# Altium PCB Servo CB Upgrade.PcbDoc
Units mm, origin at the board's own origin, x right, y up, seen from the top; angles counter-clockwise.
Board outline 98.43 x 42.16 mm, 2 copper layers (Top Layer, Bottom Layer); 27 components, 20 nets, 144 pads, 29 vias.
Unrouted connection lines stored in the file: 5.
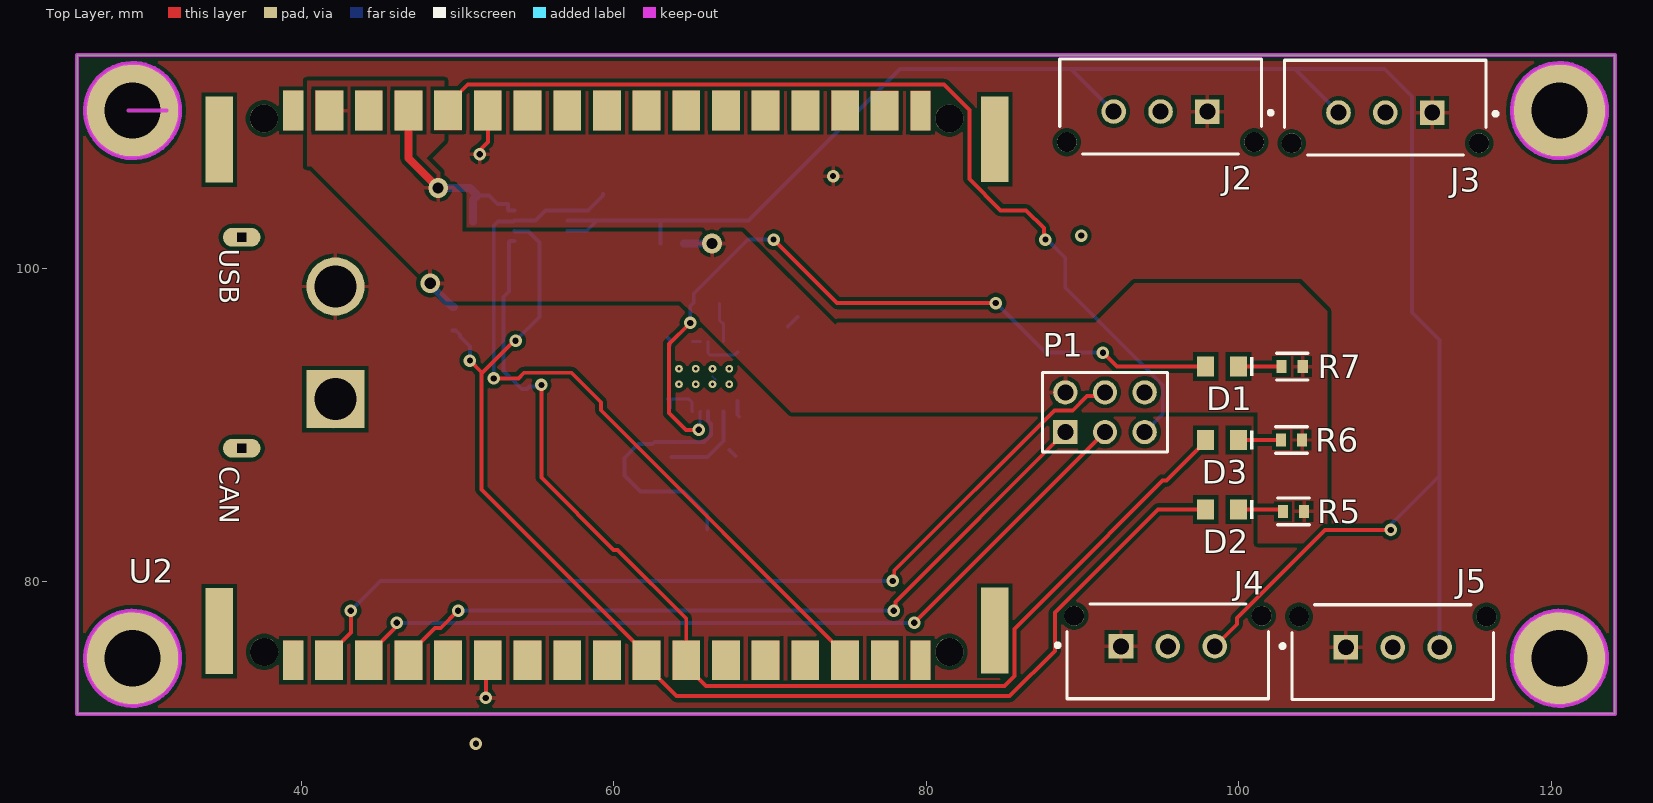
[diagram p0: Top Layer view]
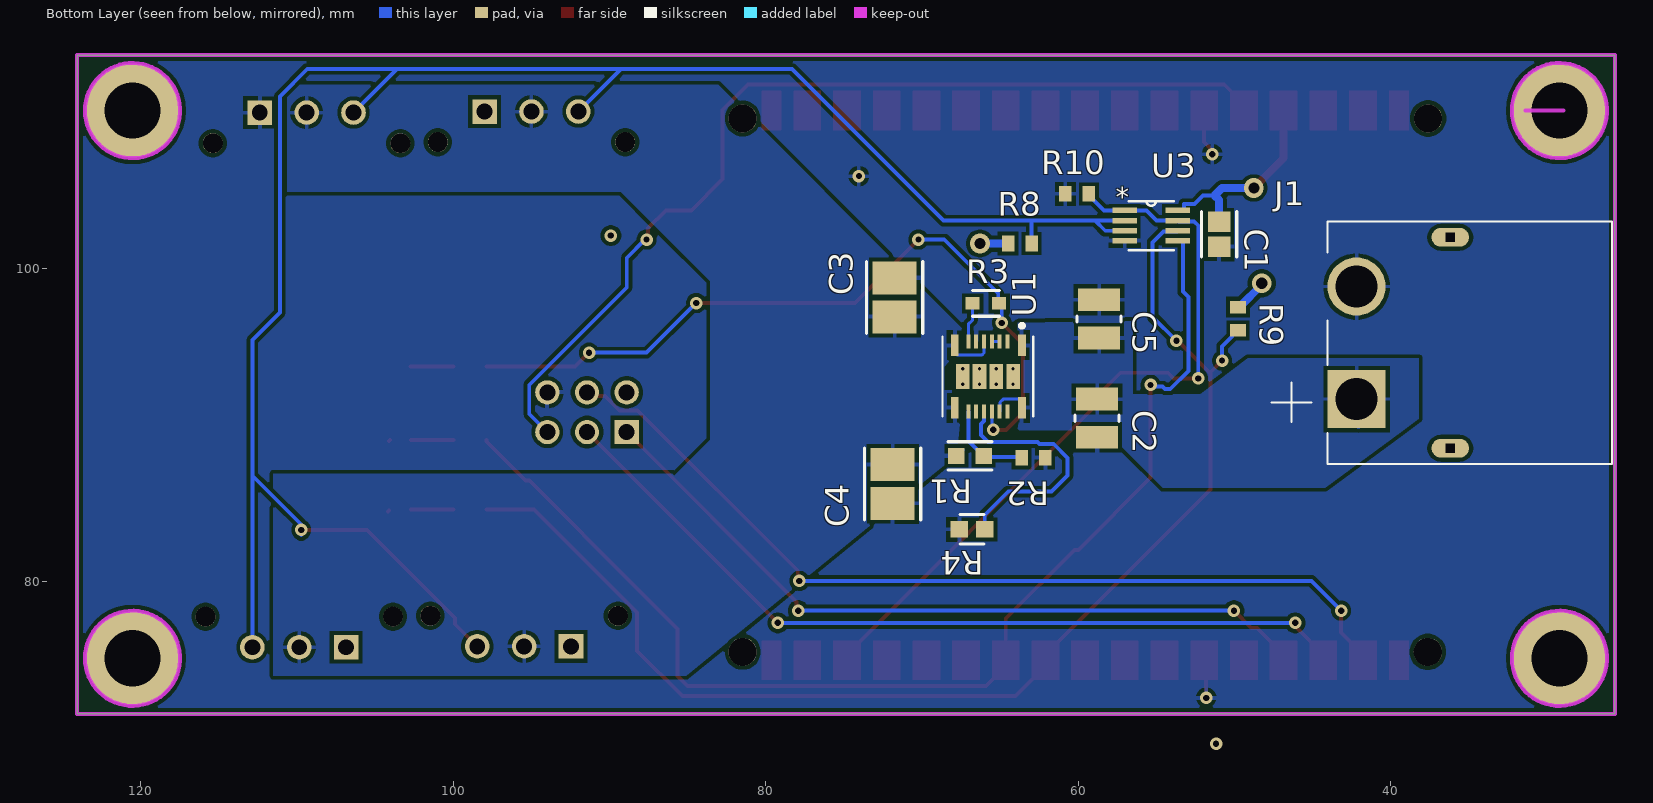
[diagram p1: Bottom Layer view, seen from below]
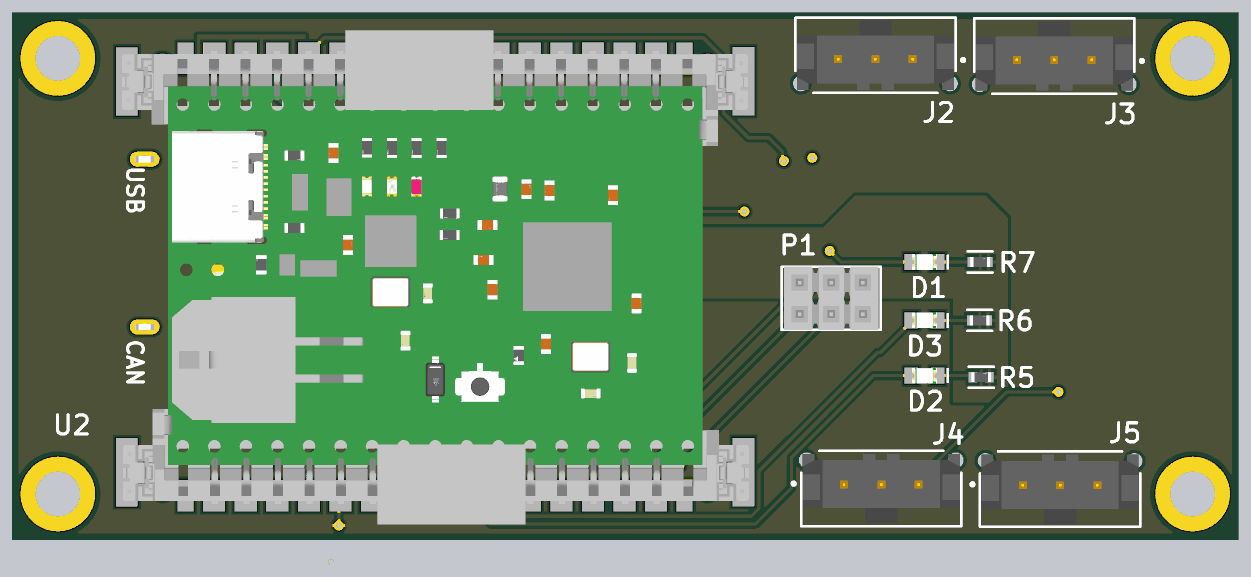
[diagram p2: 3D render of the assembled board from above, using the file's embedded part models]
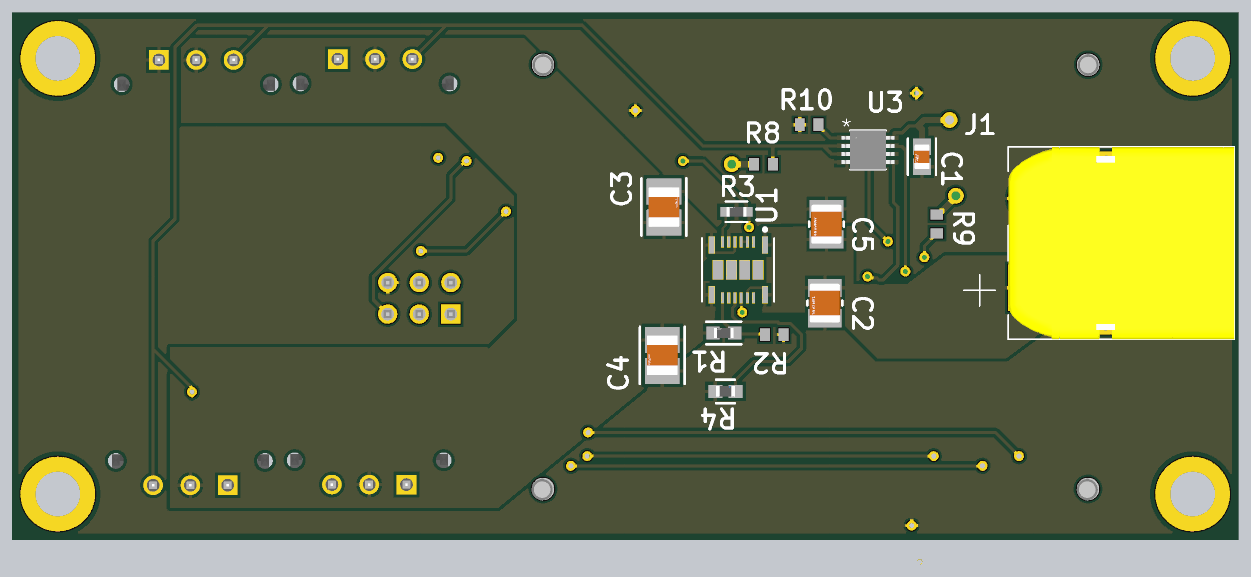
[diagram p3: 3D render of the assembled board from below, using the file's embedded part models]

## Layer stack, top to bottom
Top Solder: solder mask 0.0102, Solder Resist, Dk 3.5
Top Layer: signal copper 0.0356
Dielectric 1: dielectric 0.32, FR-4, Dk 4.8
Bottom Layer: signal copper 0.0356
Bottom Solder: solder mask 0.0102, Solder Resist, Dk 3.5

## Board outline
25.654,71.501 25.654,113.665 124.079,113.665 124.079,71.501

## Design rules (kind name [scope] priority, off if disabled: settings)
Clearance Clearance_1 [OnMid vs OnMid] p1: gap=0.254 ignorepadtopadclearanceinfootprint=FALSE sourcerule=36 cellrowname=All cellrowtype=0 cellcolname=All cellcoltype=0 innerlayers=TRUE
Clearance Clearance_2 [(ExistsOnLayer('Top Layer') Or ExistsOnLayer('Bottom Layer')) vs (ExistsOnLayer('Top Layer') Or ExistsOnLayer('Bottom Layer'))] p2: gap=0.254 ignorepadtopadclearanceinfootprint=FALSE sourcerule=36 cellrowname=All cellrowtype=0 cellcolname=All cellcoltype=0 outerlayers=TRUE
Clearance [All] p3: gap=0.254 ignorepadtopadclearanceinfootprint=FALSE ismatrix=TRUE
PolygonConnect [All] p1: connectstyle=Relief reliefconductorwidth=0.254 reliefentries=4 polygonreliefangle="90 Angle" airgapwidth=0.254
RoutingVias [All] p1: holewidth=0.711 width=1.27 viastyle="Through Hole" minholewidth=0.711 minwidth=1.27 maxholewidth=0.711 maxwidth=1.27
SolderMaskExpansion [All] p1: expansion=0.102 istentingtop=FALSE
Width [All] p1: maxlimit=0.5 minlimit=0.1 preferedwidth=0.25 minimp=50.000000 maximp=50.000000 favimp=50.000000
30 further rules are at their usual default settings.

## Components (designator, comment, footprint, x,y, rotation, side; value= is the part's Value field where it differs from the comment)
C1 "100nF" FP-0805-L_2_01_0_2-W_1_25-IPC_B 50.988,102.191 r270 bottom
C2 "10uF" FP-CL32-IPC_C 58.801,90.424 r270 bottom
C3 "47uF" FP-GRM32E-0_3-0_2-IPC_A 71.755,98.152 r90 bottom
C4 "47uF" FP-GRM32E-0_3-0_2-IPC_A 71.882,86.214 r270 bottom
C5 "10uF" FP-CL32-IPC_C 58.674,96.774 r270 bottom
D1 "150080YS75000" WL-SMCW_0805_150080xx75000 98.933,93.726 r180 top
D2 "150080YS75000" WL-SMCW_0805_150080xx75000 98.933,84.582 r180 top
D3 "150080YS75000" WL-SMCW_0805_150080xx75000 98.933,89.027 r180 top
J1 "XT60PW-M" AMASS_XT60PW-M 36.195,95.25 r270 bottom
J2 "43650-0328" FP-43650-0328-MFG 94.996,110.363 r0 top
J3 "43650-0328" FP-43650-0328-MFG 109.385,110.297 r0 top
J4 "43650-0328" FP-43650-0328-MFG 95.466,75.504 r180 top
J5 "43650-0328" FP-43650-0328-MFG 109.855,75.449 r180 top
P1 "MTSW-103-07-F-D-244" SMTC-MTSW-103-07-X-D-244 88.9,89.535 r0 top
R1 "110k" FP-AC0603-IPC_A 66.929,88.011 r0 bottom
R2 "10k" RESC1608X55X25ML10T15 62.877,87.884 r0 bottom
R3 "100k" FP-AC0603-MFG 65.913,97.77 r0 bottom
R4 "6,49k" FP-CRCW0603-e3-IPC_A 66.802,83.312 r180 bottom
R5 "1k" FP-RC0603-0_55-IPC_C 103.505,84.455 r0 top
R6 "1k" FP-RC0603-0_55-IPC_C 103.378,89.027 r0 top
R7 "1k" FP-RC0603-0_55-IPC_C 103.42,93.726 r0 top
R8 "10k" RESC1608X55X25ML10T15 63.742,101.6 r0 bottom
R9 "10k" RESC1608X55X25ML10T15 49.784,96.786 r90 bottom
R10 "10k" RESC1608X55X25ML10T15 60.071,104.775 r180 bottom
U1 "PTPSM63606RDLR" RDL0020A-MFG 65.786,93.091 r270 bottom
U2 "CANduino on 299-017-299198-1 socket" "CANduino on 299-017-299198-1 socket" 59.309,91.948 r180 top
U3 "SN74LVC2G241DCTR" DCT8 55.335,102.743 r180 bottom

## Footprints (in the part's own frame and the unit in brackets; to place one, negate y for a bottom-side part, rotate by r counter-clockwise, add the part's x,y. Pads: shape width x height; smd on the part's side, far side on the other; paste and mask are expansions set on the pad)
AMASS_XT60PW-M [mm]
  rect 3.716x3.716 / inner round 3.716 / far side rect 3.716x3.716 hole 2.7: 1(3.6,-6)
  round 3.716 hole 2.7: 2(-3.6,-6)
  oval 1.2x2.4 hole 0.6 square: S1(6.75,0) S2(-6.75,0)
  silkscreen extent -7.75,-11.43 7.75,10.35, body extent -7.75,-7.85 7.75,10.35, height 8.4
"CANduino on 299-017-299198-1 socket" [mil]
  rect 50.79x100 smd: 1(780,670) 17(-800,670) 18(-800.11,-714.83) 34(780,-715)
  rect 70.08x100 smd: 2(690,670) 3(590,670) 4(490,670) 5(390,670) 6(290,670) 7(190,670) 8(90,670) 9(-10,670) 10(-110,670) 11(-210,670) 12(-310,670) 13(-410,670) 14(-510,670) 15(-610,670) 16(-710,670) 19(-709.78,-714.61) 20(-610.61,-715.01) 21(-510.24,-715.41) 22(-410,-715) 23(-310,-715) 24(-210,-715) 25(-110,-715) 26(-10,-715) 27(90,-715) 28(190,-715) 29(290,-715) 30(390,-716) 31(490,-715) 32(590,-715) 33(689,-715)
  round 70.87 hole 70.87 unplated: 35(-873,649) 36(-873,-695) 37(854,-695) 38(853.39,649)
  rect 68.9x216.54 smd: MP1(966.54,596.46) MP2(-987.2,595.47) MP3(-987.2,-642.72) MP4(966.54,-641.73)
  Top Layer region: -826.01,619.61 -774.65,619.61 -774.65,720.25 -826.01,720.25
  Top Layer region: -745,619.98 -675,619.98 -675,719.98 -745,719.98
  Top Layer region: -645,619.98 -575,619.98 -575,719.98 -645,719.98
  Top Layer region: -545,619.98 -475,619.98 -475,719.98 -545,719.98
  Top Layer region: -445,619.98 -375,619.98 -375,719.98 -445,719.98
  Top Layer region: -45,619.98 25,619.98 25,719.98 -45,719.98
  Top Layer region: 55,619.98 125,619.98 125,719.98 55,719.98
  Top Layer region: 155,619.98 225,619.98 225,719.98 155,719.98
  Top Layer region: 255,619.98 325,619.98 325,719.98 255,719.98
  Top Layer region: 555,619.98 625,619.98 625,719.98 555,719.98
  Top Layer region: 655,619.98 725,619.98 725,719.98 655,719.98
  Top Layer region: 755,619.98 805.71,619.98 805.71,719.98 755,719.98
  Top Layer region: -345,619.98 -275,619.98 -275,719.98 -345,719.98
  Top Layer region: -245,619.98 -175,619.98 -175,719.98 -245,719.98
  Top Layer region: -145,619.98 -75,619.98 -75,719.98 -145,719.98
  Top Layer region: 355,619.98 425,619.98 425,719.98 355,719.98
  Top Layer region: 455,619.98 525,619.98 525,719.98 455,719.98
  Top Layer region: 755,-765.02 805.71,-765.02 805.71,-665.02 755,-665.02
  Top Layer region: 655,-765.02 725,-765.02 725,-665.02 655,-665.02
  Top Layer region: 555,-765.02 625,-765.02 625,-665.02 555,-665.02
  Top Layer region: 455,-765.02 525,-765.02 525,-665.02 455,-665.02
  Top Layer region: 355,-765.02 425,-765.02 425,-665.02 355,-665.02
  Top Layer region: 255,-765.02 325,-765.02 325,-665.02 255,-665.02
  Top Layer region: 155,-765.02 225,-765.02 225,-665.02 155,-665.02
  Top Layer region: 55,-765.02 125,-765.02 125,-665.02 55,-665.02
  Top Layer region: -45,-765.02 25,-765.02 25,-665.02 -45,-665.02
  Top Layer region: -145,-765.02 -75,-765.02 -75,-665.02 -145,-665.02
  Top Layer region: -245,-765.02 -175,-765.02 -175,-665.02 -245,-665.02
  Top Layer region: -345,-765.02 -275,-765.02 -275,-665.02 -345,-665.02
  Top Layer region: -445,-765.02 -375,-765.02 -375,-665.02 -445,-665.02
  Top Layer region: -545,-765.02 -475,-765.02 -475,-665.02 -545,-665.02
  Top Layer region: -645,-765.02 -575,-765.02 -575,-665.02 -645,-665.02
  Top Layer region: -745,-765.02 -675,-765.02 -675,-665.02 -745,-665.02
  Top Layer region: -826.01,-765.39 -774.65,-765.39 -774.65,-664.75 -826.01,-664.75
  body extent -1004,-804 982,761, height 515
DCT8 [mil]
  rect 61.5x14 smd paste-30.75 mask-31: 1(-66.75,38.39) 2(-66.75,12.8) 3(-66.75,-12.8) 4(-66.75,-38.39) 5(66.75,-38.39) 6(66.75,-12.8) 7(66.75,12.8) 8(66.75,38.39)
  silkscreen extent -57,-62 57,62, body extent -84,-62 84,62, height 51
FP-0805-L_2_01_0_2-W_1_25-IPC_B [mm]
  rect 1.305x1.456 smd paste+0 mask+0: 1(-0.806,0) 2(0.806,0)
  silkscreen extent -1.46,-1.13 1.46,1.13, body extent -1,-0.63 1,0.63, height 1.4
FP-43650-0328-MFG [mm]
  rect 1.57x1.57 hole 1.02 paste-2539.97 mask+0: 1(3,-0.315)
  round 1.57 hole 1.02 paste-2539.97 mask+0: 2(0,-0.315) 3(-3,-0.315)
  round 1.27 hole 1.27 unplated paste-2539.97 mask+0: ""(-6,-2.275) ""(6,-2.275)
  silkscreen extent -6.45,-3.04 7.18,3.04, body extent -6.74,-3.14 6.74,3.14, height 0.25
FP-AC0603-IPC_A [mm]
  rect 1.059x1.012 smd paste+0 mask+0: 1(-0.877,0) 2(0.877,0)
  silkscreen extent -1.41,-0.91 1.41,0.91, body extent -0.8,-0.4 0.8,0.4, height 0.55
FP-AC0603-MFG [mm]
  rect 0.9x0.8 smd paste+0 mask+0: 1(-0.85,0) 2(0.85,0)
  silkscreen extent -0.85,-0.82 0.85,0.82, body extent -0.8,-0.4 0.8,0.4, height 0.55
FP-CL32-IPC_C [mm]
  rect 1.453x2.704 smd paste+0 mask+0: 1(-1.225,0) 2(1.225,0)
  silkscreen extent -0.2,-1.4 0.2,1.4, body extent -1.6,-1.25 1.6,1.25, height 2.8
FP-CRCW0603-e3-IPC_A [mm]
  rect 1.135x1.062 smd paste+0 mask+0: 1(-0.815,0) 2(0.815,0)
  silkscreen extent -0.75,-0.95 0.75,0.95, body extent -0.77,-0.43 0.77,0.43, height 0.5
FP-GRM32E-0_3-0_2-IPC_A [mm]
  rect 2.103x2.806 smd paste+0 mask+0: 1(-1.251,0) 2(1.251,0)
  silkscreen extent -2.3,-1.8 2.3,1.8, body extent -1.6,-1.25 1.6,1.25, height 2.7
FP-RC0603-0_55-IPC_C [mm]
  rect 0.659x0.812 smd paste+0 mask+0: 1(-0.677,0) 2(0.677,0)
  silkscreen extent -1.01,-0.85 1.01,0.85, body extent -0.8,-0.4 0.8,0.4, height 0.55
RDL0020A-MFG [mm]
  rect 1.4x0.5 smd paste-0.687 mask+0: 1(-2,2.175) 8(-2,-2.125) 9(2,-2.125) 16(2,2.175)
  rect 0.9x0.25 smd paste-0.437 mask+0: 2(-2.25,1.25) 3(-2.25,0.75) 4(-2.25,0.25) 5(-2.25,-0.25) 6(-2.25,-0.75) 7(-2.25,-1.25) 10(2.25,-1.25) 11(2.25,-0.75) 12(2.25,-0.25) 13(2.25,0.25) 14(2.25,0.75) 15(2.25,1.25)
  rect 1.58x0.875 smd paste-0.777 mask+0: 17(0,1.613) 18(0,0.538) 19(0,-0.538) 20(0,-1.613)
  round 0.5 / inner round 1.524 / far side round 0.5 hole 0.203 paste-2539.97 mask+0: 21(0.5,-0.538) 22(-0.5,-0.538) 23(0.5,0.538) 24(-0.5,0.538) 25(0.5,-1.613) 26(-0.5,-1.613) 27(0.5,1.613) 28(-0.5,1.613)
  silkscreen extent -3.37,-2.9 2.55,2.9
RESC1608X55X25ML10T15 [mm] "Chip Resistor, 2-Leads, Body 1.60x0.80mm, IPC Low Density"
  rect 0.8x1 smd: 1(-0.75,0) 2(0.75,0)
  body extent -0.85,-0.45 0.85,0.45, height 0.55
SMTC-MTSW-103-07-X-D-244 [mm] "Assembly .025\" [.64] SQ Post Terminal Strip, 2x3 Pins, Vertical, 2.54mm Pitch, Male"
  rect 1.55x1.55 hole 1.02: 1(0,0)
  round 1.55 hole 1.02: 2(0,2.54) 3(2.54,0) 4(2.54,2.54) 5(5.08,0) 6(5.08,2.54)
  silkscreen extent -1.46,-1.27 6.54,3.81, body extent -1.27,-1.27 6.35,3.81, height 8.74
WL-SMCW_0805_150080xx75000 [mm] "SMD Mono-color Chip LED, body 2.0x1.25mm"
  rect 1.1x1.3 smd: 1(-1.05,0) 2(1.05,0)
  silkscreen extent -2,-0.6 -1.8,0.6, body extent -1,-0.63 1,0.62, height 0.7

## Part data
C1: library part CMP-2007-04172-2, "Automotive Ceramic Capacitor, 0805, 100nF, 10%, X7R, 15%, 100V", Case Code (Imperial)=0805, Case Code (Metric)=2012, Dielectric=X7R, Dielectric Material=Ceramic, Max Operating Temperature=125°C, Min Operating Temperature=-55°C, Package Quantity=1, Ratings=AEC-Q200, Tolerance=10%, Voltage=100V, Capacitance=100nF, Case/Package=0805, Construction=Flat, Depth=1.25mm, Height=1.4mm, Lead Free="Lead Free", Length=2.01mm, Mount="Surface Mount", Number of Pins=2, Packaging="Tape and Reel", Radiation Hardening=No, REACH SVHC="No SVHC", RoHS Compliant=Yes, Series=-, Termination=SMD/SMT, Thickness=0.055inch, Voltage Rating=100V, Voltage Rating (DC)=100V, Width=0.049inch
C2 C5: library part CMP-13271-002443-1, "Cap Ceramic 10uF 35V X7R ±10% SMD 1210 +125°C Embossed T/R", Case Code (Imperial)=1210, Case Code (Metric)=3225, Dielectric=X7R, Max Operating Temperature=125°C, Min Operating Temperature=-55°C, Package Quantity=1, Tolerance=10%, Voltage=35V, Capacitance=10uF, Case/Package=1210, Depth=2.5mm, Height=1.8mm, Lead Free="Lead Free", Length=3.2mm, Material=Ceramic, Mount="Surface Mount", Packaging="Tape and Reel", Radiation Hardening=No, Thickness=0.079inch, Voltage Rating=35V, Width=0.098inch
C3 C4: library part CMP-06035-000110-2, "Chip Multilayer Ceramic Capacitors for General Purpose, 1210, 47uF, X6S, 22%, 10%, 16V", Case Code (Imperial)=1210, Case Code (Metric)=3225, Dielectric=X6S, Max Operating Temperature=105°C, Min Operating Temperature=-55°C, Package Quantity=1000, Tolerance=10%, Voltage=16V, Capacitance=47uF, Case/Package=1210, Depth=2.5mm, Height=2.5mm, Lead Free="Lead Free", Length=3.2mm, Material=Ceramic, Mount="Surface Mount", Packaging="Tape and Reel", REACH SVHC="No SVHC", Termination=SMD/SMT, Thickness=0.106inch, Voltage Rating=16V, Voltage Rating (DC)=16V, Weight=0.00388oz, Width=2.5mm
D1 D2 D3: library part CMP-1426-00012-3, "2 V Yellow LED 2012 (0805) SMD, Wurth Elektronik WL-SMCW 150080YS75000", Case Code (Imperial)=0805, Case Code (Metric)=2012, Color=Yellow, Forward Current=100mA, Forward Voltage=2V, Max Junction Temperature (Tj)=95°C, Max Operating Temperature=85°C, Max Reverse Voltage (DC)=5V, Min Operating Temperature=-40°C, Power Dissipation=72mW, Test Current=20mA, Case/Package=0805, Dominant Wavelength=590nm, Height=700µm, Length=2mm, Lens Style="Clear, Rectangular", Luminous Intensity=120mcd, Mount="Surface Mount", Packaging="Tape and Reel", Peak Wavelength=595nm, REACH SVHC=Unknown, Reverse Voltage=5V, RoHS=Compliant, Viewing Angle=140°, Wavelength=590nm, Width=1.25mm
J1: "Socket, DC supply, male, PIN: 2", Package=Package, Availability="Not in stock", Check_prices=https://www.snapeda.com/parts/XT60PW-M/AMASS/view-part/?ref=eda, MF=AMASS, MP=XT60PW-M, Price=None, SnapEDA_Link=https://www.snapeda.com/parts/XT60PW-M/AMASS/view-part/?ref=snap
J2 J3 J4 J5: library part CMP-00257-07661218-1, "43650-0328 Connector Header HDR 3 POS 3mm Solder ST Thru-Hole 3 Terminal 1 Port Micro-Fit 3.0 Tray", Current Rating=5A, Manufacturer Lifecycle Status=ACTIVE, Max Operating Temperature=125°C, Min Operating Temperature=-40°C, Voltage Rating=600V, Contact Material="Brass, Gold, Nickel", Contact Plating=Gold, Country of Origin=US, Glow Wire Compliant=Compliant, Halogen Free="Low Halogen", Height=10.15mm, Housing Material=Thermoplastic, Lifecycle Status=Production, Mount="Through Hole", NexarPartId=7661218, Number of Circuits=3, Number of Contacts=3, Number of Positions=3, Number of Rows=1, Orientation=Vertical, Pitch=3mm, Plating=Tin, Radiation Hardening=No, RoHS=Compliant, Schedule B=8536694040, Termination="Through Hole"
P1: library part CMP-1024-00098-1, "Modified .025\" SQ Post Header, Through-hole, Vertical, -55 to 125 degC, 2.54 mm Pitch, 6-Pin, Male, RoHS", Manufacturer=Samtec, Temperature Range="-55 to 125 degC", ComponentLink1Description="Manufacturer URL", ComponentLink1URL=http://www.samtec.com, ComponentLink2Description=Datasheet, ComponentLink2URL=http://www.samtec.com/documents/webfiles/pdf/MTSW.PDF, ComponentLink3Description="Package Specification", ComponentLink3URL=http://www.samtec.com/documents/webfiles/cpdf/MTSW-XXX-XX-X-X-XXXX-XX-XXX-MKT1.pdf, DatasheetVersion=F-214, Mounting Technology=Through-hole, Orientation=Vertical, PackageDescription="Assembly .025\" [.64] SQ Post Terminal Strip", PackageReference=MTSW-103-07-X-D-244, PackageVersion="BI, 2/1987", PartNumber=MTSW-103-07-F-D-244, Pitch="2.54 mm", RoHS=True
R1: library part CMP-03412-026184-2, "RES 110KΩ 1.00% 0.1W 0603", Case Code (Imperial)=0603, Case Code (Metric)=1608, Max Operating Temperature=155°C, Max Power Dissipation=100mW, Min Operating Temperature=-55°C, Resistance=110kR, Resistor Type="Thick Film", Temperature Coefficient=100ppm/°C, Tolerance=1%, Voltage Rating=50V, Case/Package=0603, Features="Moisture Resistant", Height=0.022inch, Length=0.063inch, Number of Terminations=2, Packaging="Tape and Reel", Power Rating=100mW, RoHS Compliant=Yes, Series=AC, Termination=SMD/SMT, Width=0.8mm
R2 R8 R9 R10: library part CMP-2000-05022-1, "Resistor, 10 KOhm, +/- 5%, 100 mW, -55 to 155 degC, 0603 (1608 Metric), RoHS, Tape and Reel", Case Code - in=0603, Case Code - mm=1608, Manufacturer=Yageo, Operating Temperature Range=-55Cto+155C, Package Description="2-Pin Surface Mount Device, Body 1.6 x 0.8 mm", Package Reference=603, Power Rating=100mW, Resistance=10kOhms, Temperature Coefficient=100PPM/C, Tolerance=5%, Voltage Rating=50V, Datasheet URL=http://www.farnell.com/datasheets/443971.pdf, Datasheet Version="Rev. 4, 04/2009", Manufacturer URL=http://www.yageo.com/, Packaging=Reel, Product=ThickFilmResistorsGeneralPurpose, Series=RC, Termination Style=SMD/SMT
R3: library part CMP-2000-04816-3, "RES 100KΩ 1.00% 0.1W 0603", Case Code (Imperial)=0603, Case Code (Metric)=1608, Max Operating Temperature=155°C, Max Power Dissipation=100mW, Min Operating Temperature=-55°C, Package Quantity=1, Ratings=AEC-Q200, Resistance=100kR, Resistor Type="Thick Film", Temperature Coefficient=100ppm/°C, Tolerance=1%, Voltage Rating=50V, Working Voltage=75V, Case/Package=0603, Construction=Rectangular, Depth=0.8mm, Features="Moisture Resistant", Height=0.022inch, Lead Free="Lead Free", Length=1.6mm, Military Standard=Not, Moisture Sensitivity Level=1, Number of Terminations=2, Packaging="Tape and Reel", Power Rating=100mW, RoHS Compliant=Yes, Series=AC, Technology="THICK FILM", Termination=SMD/SMT, Width=0.031inch
R4: library part CMP-2000-03548-2, "RES Thick Film, 6.49kΩ, 1%, 0.1W, 100ppm/°C, 0603", Case Code (Imperial)=0603, Case Code (Metric)=1608, Max Operating Temperature=155°C, Max Power Dissipation=100mW, Min Operating Temperature=-55°C, Package Quantity=10, Resistance=6.49kR, Temperature Coefficient=100ppm/°C, Tolerance=1%, Voltage Rating=75V, Case/Package=0603, Composition="Thick Film", Contact Plating=Tin, Depth=0.85mm, Features="Automotive AEC-Q200", Height=0.45mm, Length=1.55mm, Military Standard=Not, Number of Pins=2, Number of Terminations=2, Packaging="Tape and Reel", Power Rating=100mW, Radiation Hardening=No, Termination=SMD/SMT, Weight=7.1E-05oz, Width=0.033inch
R5 R6 R7: library part CMP-1659-00009-5, "RES 1K OHM 1% 1/10W 0603", Case Code (Imperial)=0603, Case Code (Metric)=1608, Max Operating Temperature=155°C, Max Power Dissipation=100mW, Min Operating Temperature=-55°C, Resistance=1kR, Resistance Tolerance=1%, Resistor Type="Thick Film", Temperature Coefficient=100ppm/°C, Voltage Rating=50V, Case/Package=0603, Construction=Rectangular, Contact Plating=Tin, Depth=0.8mm, Features="Moisture Resistant", Height=0.45mm, Lead Free="Lead Free", Length=1.6mm, Military Standard=Not, Number of Terminations=2, Packaging="Tape and Reel", Power Rating=100mW, Radiation Hardening=No, REACH SVHC="No SVHC", RoHS Compliant=Yes, Series=RC, Size Code=0603, Technology="THICK FILM", Termination=SMD/SMT, Tolerance=1%
U1 U3: "No Description Available", Mfr_Name="Texas Instruments", RefDes=RefDes
  U1: TYPE=TYPE
  U3: TYPE=Type
U2: "CANduino board without pins 1, 17, 18 and 34 due to socket specification"

## Via types
v1: diameter 0.8, hole 0.4, Top Layer to Bottom Layer, 22 vias
v2: diameter 6, hole 3.6, Top Layer to Bottom Layer, 4 vias
v3: diameter 1.27, hole 0.711, Top Layer to Bottom Layer, 3 vias

## Nets (pads, with @x,y where several pads share a name; then routed paths per layer and width w, separated by ;. In a path a pad name is that pad's centre, name@x,y a point inside that pad or via, vN(x,y) a via of type N, cw(c..) or ccw(c..) an arc to the next point about the centre after c; other vN are vias at no path point)
+5: C1.1 P1.2 R5.2 R6.2 R7.2 R8.2 R9.2 U2.31 U2.33 U3.8 | length 17.6
  Top Layer w0.254: R6.2 R6.2@104.118,88.963 ; R5.2@104.118,84.519 R5.2
  Top Layer w0.5: U2.31 46.863,107.061 v3(48.768,105.156) ; v3(48.26,99.06) v3@48.407,99.207
  Bottom Layer w0.25: 51.28,104.676 52.012,104.676 52.563,104.125 53.228,104.125 53.228,103.771 53.281,103.718 U3.8
  Bottom Layer w0.5: v3(48.26,99.06) 48.26,98.96 49.684,97.536 R9.2 ; v3(48.768,105.156) 50.8,105.156 51.28,104.676 50.988,104.384 C1.1 ; R8.2 v3(66.294,101.6)
DATA_SERVO: J2.3 J3.3 J4.3 J5.3 R8.1 U3.2 U3.3 | length 125.9
  Top Layer w0.25: J4.3 99.882,77.235 99.882,77.629 105.525,83.273 v1(109.728,83.273)
  Bottom Layer w0.25: U3.3 58.278,102.418 58.928,103.068 ; U3.2 58.928,103.068 ; R8.1 62.992,103.068 ; J2.3 89.268,112.776 ; J3.3 103.591,112.776 ; v1@109.728,82.931 v1(109.728,83.273) 109.728,83.614 112.855,86.741 ; J5.3 112.855,86.741 ; 58.928,103.068 62.992,103.068 ; 62.992,103.068 68.616,103.068 78.324,112.776 89.268,112.776 ; 89.268,112.776 103.591,112.776 ; 103.591,112.776 109.347,112.776 111.101,111.022 111.101,97.179 112.855,95.425 112.855,86.741
GND: C1.2 C2.2 C3.2 C4.2 C5.1 J1.2 J2.1 J3.1 J4.1 J5.1 P1.6 R2.1 R4.1 R10.1 U1.6 U1.11 U1.17 U1.18 U1.19 U1.20 U2.6 U2.29 U3.4 | length 5.8
  Top Layer w0.25: v1(51.435,107.315) 51.435,107.591 51.943,108.099 U2.29 ; v1(51.816,72.517) 51.816,74.803 U2.6
  Bottom Layer w0.1: U1.19 U1.19@66.536,92.879
  other v1: 74.041,105.918
MOSI: P1.4 U2.2 | length 58.5
  Top Layer w0.25: v1(77.851,80.01) 77.956,80.115 77.956,80.677 88.2,90.921 89.378,90.921 90.29,91.833 91.198,91.833 P1.4
  Top Layer w0.254: U2.2 41.783,75.31 43.18,76.707 v1(43.18,78.105)
  Bottom Layer w0.25: v1(43.18,78.105) 45.085,80.01 v1(77.851,80.01)
  Bottom Layer w0.254: P1.4@91.44,91.724 P1.4
NetD1_1: D1.1 R7.1 | length 2.8
  Top Layer w0.25: D1.1 R7.1
NetD1_2: D1.2 R3.1 U1.13 | length 49.4
  Top Layer w0.25: v1(64.897,96.52) 63.544,95.167 63.544,90.761 64.63,89.675 v1(65.449,89.675) ; v1(70.231,101.854) 74.295,97.79 v1(84.455,97.79) ; v1(91.313,94.615) 92.202,93.726 D1.2
  Bottom Layer w0.2: v1(65.449,89.675) 65.515,89.741 65.515,90.82 U1.13
  Bottom Layer w0.25: v1(64.897,96.52) 64.897,97.604 65.125,97.832 65.125,98.399 68.58,101.854 v1(70.231,101.854) ; v1(84.455,97.79) 87.63,94.615 v1(91.313,94.615)
NetD2_1: D2.1 R5.1 | length 2.7
  Top Layer w0.25: D2.1 R5.1@102.701,84.582
NetD3_1: D3.1 R6.1 | length 2.7
  Top Layer w0.25: D3.1 R6.1
NetP1_1: P1.1 U2.4 | length 48.6
  Top Layer w0.25: v1(77.922,78.105) 78.028,78.21 78.028,78.662 P1.1
  Top Layer w0.254: U2.4 46.863,75.31 48.553,77 48.933,77 v1(50.038,78.105)
  Bottom Layer w0.25: v1(50.038,78.105) v1(77.922,78.105)
NetP1_3: P1.3 U2.3 | length 53.5
  Top Layer w0.25: v1(79.229,77.324) P1.3
  Top Layer w0.254: U2.3 44.323,75.31 46.016,77.003 46.016,77.22 v1(46.12,77.324)
  Bottom Layer w0.25: v1(46.12,77.324) v1(79.229,77.324)
NetR1_1: R1.1 R2.2 U1.10 | length 5.5
  Bottom Layer w0.25: R2.2@63.691,87.947 R1.1@65.989,87.947 ; R1.1 66.076,88.011 67.036,88.971 U1.10
NetR3_2: R3.2 U1.7 | length 2.5
  Bottom Layer w0.2: R3.2 66.763,96.707 67.036,96.434 U1.7
NetU1_3: U1.3 U1.4 | length 0.5
  Bottom Layer w0.2: U1.3 U1.4
PinDigital: P1.5 U2.30 | length 62.1
  Top Layer w0.254: U2.30 49.403,110.514 50.659,111.771 81.125,111.771 82.764,110.132 82.764,105.729 84.765,103.728 86.391,103.728 87.526,102.593 87.526,101.958 v1(87.63,101.854)
  Bottom Layer w0.25: v1@87.718,101.854 88.9,100.672 88.9,98.79 95.136,92.554 95.136,90.691 P1.5
  Bottom Layer w0.254: v1(87.63,101.854) v1@87.718,101.854
POWER_SERVO: C3.1 C4.1 J2.2 J3.2 J4.2 J5.2 R1.2 U1.5 U1.8 U1.9 | length 5.4
  Bottom Layer w0.2: U1.5 66.036,94.592 66.153,94.475 67.745,94.475 U1.8@67.911,94.641
  Bottom Layer w0.25: R1.2@67.423,88.392 R1.2 R1.2 ; U1.8@67.786,94.516 U1.8@67.911,94.641 ; U1.9@67.911,91.541 U1.9 67.911,90.641 U1.9@68.036,90.516 ; C3.1@71.137,96.283 C3.1
RT: R4.2 U1.12 | length 16.1
  Bottom Layer w0.25: R4.2 65.987,84.218 64.482,85.723 61.724,85.723 60.683,86.764 60.683,87.876 61.57,88.763 62.474,88.763 62.607,88.896 65.772,88.896 66.228,89.352 66.228,90.038 66.036,90.23 U1.12
RX: D2.2 R9.1 U2.10 U3.6 | length 81.6
  Top Layer w0.25: 88.231,77.981 94.832,84.582 D2.2
  Top Layer w0.254: v1(50.8,94.107) 51.543,93.364 51.543,93.287 ; v1(53.721,95.377) 53.632,95.377 51.543,93.287 ; 88.231,77.981 88.231,75.531 85.344,72.644 64.009,72.644 62.103,74.55 U2.10 62.103,75.31 51.543,85.87 51.543,93.287
  Bottom Layer w0.25: R9.1@50.157,95.663 50.8,95.02 v1(50.8,94.107) ; v1(53.721,95.377) 55.245,96.901 55.245,101.132
  Bottom Layer w0.254: R9.1@49.684,96.036 R9.1 49.884,96.036 50.157,95.763 R9.1@50.157,95.663 ; U3.6 53.69,102.367 54.538,102.367 55.245,101.66 55.245,101.132
TX: D3.2 U2.11 U3.5 | length 75.9
  Top Layer w0.25: 88.231,79.529 95.134,86.432 95.388,86.432 97.883,88.927 D3.2
  Top Layer w0.254: v1(55.372,92.553) 55.372,86.614 59.996,81.99 60.25,81.99 64.643,77.597 U2.11 64.643,74.55 65.92,73.273 84.997,73.273 85.64,73.915 85.64,76.938 88.231,79.529
  Bottom Layer w0.25: U3.5 53.348,101.768 53.295,101.715 53.295,98.539 52.94,98.184 52.94,93.453 54.114,92.278 54.448,92.278 54.618,92.448 55.267,92.448 v1(55.372,92.553)
TX_Enable: R10.2 U2.15 U3.1 U3.7 | length 48.5
  Top Layer w0.25: v1(52.324,92.964) 53.9,92.964 54.268,93.332 57.29,93.332 59.181,91.441 59.181,90.932
  Top Layer w0.254: 59.181,90.932 74.803,75.31 U2.15
  Bottom Layer w0.25: v1(52.324,92.964) 52.324,102.758 52.588,103.022 53.594,103.022 U3.7 54.984,103.068 55.634,103.718 U3.1 58.364,103.718 R10.2@59.321,104.675
  Bottom Layer w0.254: R10.2@59.321,104.675 R10.2
VBAT: C2.1 C5.2 J1.1 U1.1 U1.14 U1.16 | length 3.7
  Bottom Layer w0.2: U1.16@63.611,91.526 63.73,91.645 64.808,91.645 65.015,91.438 65.015,90.862 U1.14
  Bottom Layer w0.254: U1.16@63.488,91.649 63.611,91.526 U1.16 ; U1.1@63.488,95.549 63.611,95.426 U1.1
  Bottom Layer w0.5: J1.1@42.068,89.999 J1.1@42.366,90.297
pads on no net: J1.S1 J1.S2 J2. J3. J4. J5. U1.2 U1.15 U1.21 U1.22 U1.23 U1.24 U1.25 U1.26 U1.27 U1.28 U2.1 U2.5 U2.7 U2.8 U2.9 U2.12 U2.13 U2.14 U2.16 U2.17 U2.18 U2.19 U2.20 U2.21 U2.22 U2.23 U2.24 U2.25 U2.26 U2.27 U2.28 U2.32 U2.34 U2.35 U2.36 U2.37 U2.38 U2.MP1 U2.MP2 U2.MP3 U2.MP4
copper on no net:
  other v1: 51.181,69.596 89.916,102.108
  other v2: 29.21,75.057 120.523,75.057 29.21,110.109 120.523,110.109

## Polygon pours and split planes (outlines as drawn)
GND on Top Layer "GND_L01_P007" (solid, pour order 7): 25.654,71.501 25.654,113.665 124.079,113.665 124.079,71.501
+5 on Top Layer "+5_L01_P005" (solid, pour order 5): 105.664,82.423 105.664,97.282 103.886,99.06 93.345,99.06 90.805,96.52 74.295,96.52 74.168,96.393 68.199,102.362 50.292,102.362 50.292,104.775 48.006,107.061 49.149,108.204 49.149,112.014 40.386,112.014 40.386,106.553 40.64,106.553 49.276,97.917 64.262,97.917 71.374,90.805 101.219,90.805 101.219,82.423
GND on Bottom Layer "GND_L02_P008" (solid, pour order 8): 25.654,71.501 25.654,113.665 124.079,113.665 124.079,71.501
POWER_SERVO on Bottom Layer "POWER_SERVO_L02_P004" (solid, pour order 4): 110.52,111.127 109.887,111.76 83.05,111.76 67.437,96.147 67.437,94.361 67.945,94.361 68.58,93.726 68.58,92.202 67.564,92.202 67.437,92.075 67.754,88.099 85.09,73.937 111.506,73.937 111.506,74.318 111.506,86.868 85.979,86.868 85.852,86.741 83.566,89.027 83.566,99.187 89.281,104.902 110.617,104.902 110.617,110.96 110.448,111.129
VBAT on Bottom Layer "VBAT_L02_P001" (solid, pour order 1): 39.243,94.256 42.56,94.256 49.149,94.256 52.197,91.948 56.515,91.948 56.515,96.647 63.881,96.52 63.779,90.403 63.881,89.662 58.293,89.662 54.61,85.979 44.196,85.979 39.37,89.535 38.205,90.394 38.205,94.256

## Keep-outs
Keep-Out Layer:
  circle w0.254: c120.523,110.109 r3.048
  circle w0.254: c120.523,75.057 r3.048
  circle w0.254: c29.21,75.057 r3.048
  circle w0.254: c29.21,110.109 r3.048
  lines w0.254: 28.956,110.109 31.369,110.109 ; 25.654,71.501 120.396,71.501 124.079,71.501 124.079,113.665 120.396,113.665 25.654,113.665 25.654,71.501

## Silkscreen, mask and mechanical layers (free items; w line width, h text height)
Board:
  the board outline again, w0.254

## Text inside footprints (layer, text, board x,y; h text height)
U2: Top Overlay "CAN" at 34.803,87.342 h1.27 r270; Top Overlay "USB" at 34.803,101.279 h1.27 r270; Mechanical 1 "USB-PORT" at 40.009,103.126 h1 r270; Mechanical 1 "CAN-PORT" at 39.809,89.147 h1 r270
U3: Bottom Overlay "*" at 57.602,103.947 h1.27; Bottom 3D Body "*" at 57.602,103.947 h1.27